# EAGLE board Leak+Hunter+v2 (EAGLE 9.7.0)
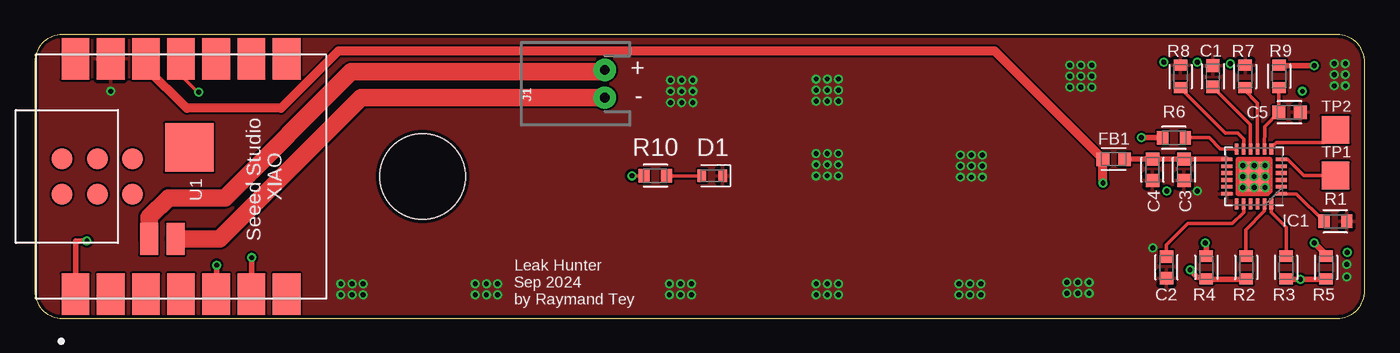
[diagram p0: board, top side]
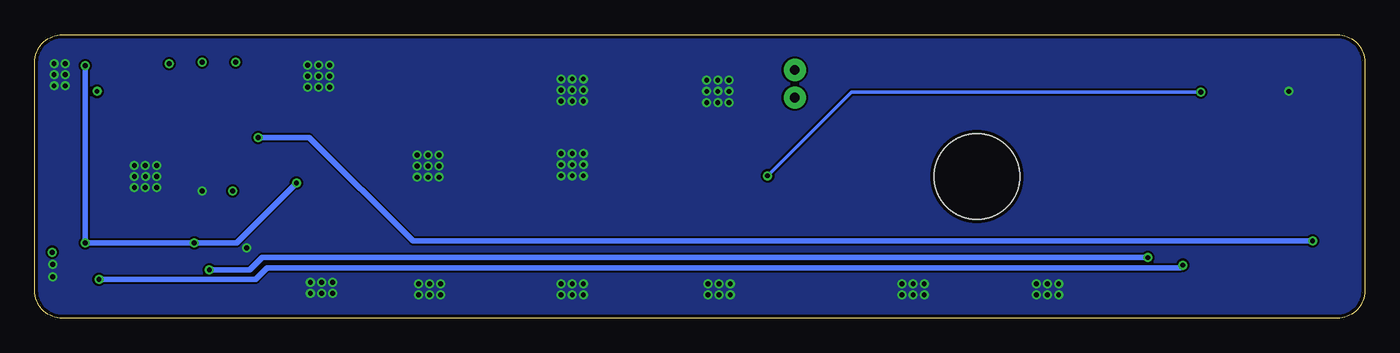
[diagram p1: board, bottom side, seen from below]

Size 96 x 20.5 mm. Coordinates in mm from the lower left corner, seen from the top.
Outline: 0,18.5 0,2 arc90 2,0 94,0 arc90 96,2 96,18.5 arc90 94,20.5 2,20.5 arc90 0,18.5
Copper layers (1*16): Top 0.035mm / dielectric 1.5mm / Bottom 0.035mm
Design rules "Fusion Electronics Design Rules": minimum track width 6mil, minimum drill 0.2mm, track to track 0.15mm, track to pad 0.15mm, pad to pad 0.15mm, via to via 0.15mm, smd to smd 0.15mm, copper to edge 0.25mm, drill to drill 0.2mm, minimum pad ring 0.15mm, minimum via ring 0.15mm, stop-mask expansion 4mil, vias tented up to drill 0mil, thermal gap 10mil
Net classes: 0 default: width 0.254 mm
Holes 6.2 mm at 28,10.25

## Footprints (pad centres in the part's own frame; a part is rotated, then mirrored left to right if it is on the bottom)
CAPC1608X85 = smd 0.921 x 0.97: 1 -0.775,0; 2 0.775,0
LEDC1608X80N_FLAT-R = smd 0.612 x 0.912: A 0.75,0; C -0.75,0
BEADC1608X95N = smd 0.9 x 0.97: 1 -0.785,0 | smd 0.933 x 0.97: 2 0.769,0
QFN50P400X400X95-25T265X275N = smd 0.26 x 0.79: 1 -1.25,-1.97; 2 -0.75,-1.97; 3 -0.25,-1.97; 4 0.25,-1.97; 5 0.75,-1.97; 6 1.25,-1.97; 13 1.25,1.97; 14 0.75,1.97; 15 0.25,1.97; 16 -0.25,1.97; 17 -0.75,1.97; 18 -1.25,1.97 | smd 0.79 x 0.26: 7 1.97,-1.25; 8 1.97,-0.75; 9 1.97,-0.25; 10 1.97,0.25; 11 1.97,0.75; 12 1.97,1.25; 19 -1.97,1.25; 20 -1.97,0.75; 21 -1.97,0.25; 22 -1.97,-0.25; 23 -1.97,-0.75; 24 -1.97,-1.25 | smd 2.15 x 2.05: 25 0,0
JST-2-PTH-NS = drill 0.7 pad 1.6: 1 -1,0; 2 1,0
RESC1608X60 = smd 0.799 x 0.974: 1 -0.815,0; 2 0.815,0
TP20SQ = smd 2 x 2: TP 0,0
XIAO-ESP32C3-MODULE14P-2.54-21X17.8MM = smd 3 x 2: 1 -8.5,7.62; 2 -8.5,5.08; 3 -8.5,2.54; 4 -8.5,0; 5 -8.5,-2.54; 6 -8.5,-5.08; 7 -8.5,-7.62; 8 8.5,-7.62; 9 8.5,-5.08; 10 8.5,-2.54; 11 8.5,0; 12 8.5,2.54; 13 8.5,5.08; 14 8.5,7.62 | smd 1.5 x 1.5: 15 -1.27,8.58; 16 1.27,8.58; 17 -1.27,6.04; 18 1.27,6.04; 19 -1.27,3.5; 20 1.27,3.5 | smd 2.3 x 1.3: 21 -4.5,2.3; 22 -4.5,0.4 | smd 3.5 x 3.5: 23 2.1,-0.6

## Placement (x,y rotation side)
C1  100n  [CAPC1608X85]  85.03,17.49 90 top
C2  2.2n  [CAPC1608X85]  81.68,3.68 270 top
C3  100n  [CAPC1608X85]  82.95,10.74 270 top
C4  10µ  [CAPC1608X85]  80.67,10.74 270 top
C5  10n  [CAPC1608X85]  90.57,14.89 0 top
D1  LED_RED  [LEDC1608X80N_FLAT-R]  48.9,10.3 180 top
FB1  FERRITE_BEAD  [BEADC1608X95N]  77.87,11.5 180 top
IC1  MPU6050  [QFN50P400X400X95-25T265X275N]  88,10.25 90 top
J1  [JST-2-PTH-NS]  41.14,16.95 90 top
R1  0  [RESC1608X60]  93.87,7 0 top
R2  0  [RESC1608X60]  87.44,3.68 90 top
R3  0  [RESC1608X60]  90.31,3.68 90 top
R4  4.7k  [RESC1608X60]  84.56,3.68 90 top
R5  4.7k  [RESC1608X60]  93.19,3.68 90 top
R6  0  [RESC1608X60]  82.22,13.05 0 top
R7  4.7k  [RESC1608X60]  87.36,17.47 90 top
R8  0  [RESC1608X60]  82.7,17.47 90 top
R9  0  [RESC1608X60]  89.81,17.49 90 top
R10  150  [RESC1608X60]  44.8,10.3 0 top
TP1  TPTP20SQ  [TP20SQ]  93.88,10.31 0 top
TP2  TPTP20SQ  [TP20SQ]  93.88,13.61 0 top
U1  XIAO-ESP32C3  [XIAO-ESP32C3-MODULE14P-2.54-21X17.8MM]  10.57,10.25 90 top

## Library data of the parts
C1-C5 = Capacitor; CATEGORY: Capacitor
D1 = LED; CATEGORY: LED; COLOR: RED; DESCRIPTION: CHIP LED FLAT; SUB-CATEGORY: CHIP; TYPE: FLAT_TOP
FB1 = Filter; CATEGORY: Filter; SUB-CATEGORY: Ferrite bead
IC1 = invensense
J1 = SparkFun-Connectors
R1-R10 = Resistor; CATEGORY: Resistor; SUB-CATEGORY: Fixed
TP1 TP2 = testpad
U1 = Seeed Studio XIAO Series

## Nets
+3.3V: FB1.2 R4.2 R5.2 R9.2 U1.12
+3.3V_MEMS: C3.1 C4.1 FB1.1 IC1.13
+3.3V_MEMS_VLOGIC: C5.1 IC1.8 R9.1
GND: C1.2 C2.2 C3.2 C4.2 C5.2 D1.C IC1.18 IC1.25 R1.2 R7.2 R8.2 U1.13
N$1: IC1.7 TP2.TP
N$2: IC1.6 TP1.TP
N$3: IC1.1 R1.1
N$4: IC1.23 R2.2
N$5: R2.1 R4.1 U1.6
N$6: IC1.24 R3.2
N$7: R3.1 R5.1 U1.5
N$8: IC1.9 R7.1
N$9: IC1.12 R6.2
N$10: R6.1 U1.1
N$11: IC1.11 R8.1
N$12: C1.1 IC1.10
N$13: C2.1 IC1.20
N$14: J1.1 U1.22
N$15: J1.2 U1.21
N$22: R10.1 U1.11
N$23: D1.A R10.2

## Tracks (layer width: path | path; a pad name or v marks a point on that pad's centre or on a via)
+3.3V  (via drill 0.35)
  Top 0.381: v84.47,5.46 84.56,5.38 R4.2 | v92.35,5.46 93.19,4.61 R5.2 | v92.35,18.25 89.86,18.25
  Top 0.635: v77.11,9.78 FB1.2 69.28,19.32 21.91,19.32 17.78,15.18 10.97,15.18 8.03,18.13 U1.12 | 89.86,18.25 R9.2
  Bottom 0.381: v77.11,9.78 81.43,5.46 v84.47,5.46 v92.35,5.46 v92.35,18.25
+3.3V_MEMS
  Top 0.381: FB1.1 78.67,11.51 C4.1 C3.1 86.02,11.51 IC1.13
+3.3V_MEMS_VLOGIC
  Top 0.254: IC1.8 88.78,13.87 C5.1 89.8,16.66 R9.1
GND  (via drill 0.35)
  other vias: 88,10.25 88.8,10.25 88.8,11.05 88.03,11.05 87.2,11.05 87.2,10.25 87.2,9.45 88.03,9.45 5.5,16.4 80.7,5.1 83.9,9.2 76.3,17.5 58,11.1 47.5,16.4 58,16.5 94.6,17.6 68.4,11 76.1,1.8 68.3,1.7 58,1.7 47.4,1.7 33.4,1.7 23.7,1.7 76.3,18.3 58,11.9 47.5,17.2 58,17.3 94.6,18.4 68.4,11.8 76.1,2.6 68.3,2.5 58,2.5 47.4,2.5 33.4,2.5 23.7,2.5 74.7,18.3 56.4,11.9 45.9,17.2 56.4,17.3 66.8,11.8 74.5,2.6 66.7,2.5 56.4,2.5 45.8,2.5 31.8,2.5 22.1,2.5 75.5,18.3 57.2,11.9 46.7,17.2 57.2,17.3 93.8,18.4 67.6,11.8 75.3,2.6 67.5,2.5 57.2,2.5 46.6,2.5 32.6,2.5 22.9,2.5 74.7,16.7 56.4,10.3 45.9,15.6 56.4,15.7 66.8,10.2 74.7,17.5 56.4,11.1 45.9,16.4 56.4,16.5 66.8,11 74.5,1.8 66.7,1.7 56.4,1.7 45.8,1.7 31.8,1.7 22.1,1.7 75.5,16.7 57.2,10.3 46.7,15.6 57.2,15.7 93.8,16.8 67.6,10.2 76.3,16.7 58,10.3 47.5,15.6 58,15.7 94.6,16.8 68.4,10.2 75.5,17.5 57.2,11.1 46.7,16.4 57.2,16.5 93.8,17.6 67.6,11 75.3,1.8 67.5,1.7 57.2,1.7 46.6,1.7 32.6,1.7 22.9,1.7 94.7,3.9 94.7,3 88.8,9.45
  pour Top: 2.01,0.13 93.99,0.13 94.29,0.15 94.58,0.22 94.85,0.33 95.1,0.49 95.32,0.68 95.51,0.9 95.67,1.15 95.78,1.42 95.85,1.71 95.87,2.01 95.87,18.49 95.85,18.79 95.78,19.08 95.67,19.35 95.51,19.6 95.32,19.82 95.1,20.01 94.85,20.17 94.58,20.28 94.29,20.35 93.99,20.37 2.01,20.37 1.71,20.35 1.42,20.28 1.15,20.17 0.9,20.01 0.68,19.82 0.49,19.6 0.33,19.35 0.22,19.08 0.15,18.79 0.13,18.49 0.13,2.01 0.15,1.71 0.22,1.42 0.33,1.15 0.49,0.9 0.68,0.68 0.9,0.49 1.15,0.33 1.42,0.22 1.71,0.15
  pour Bottom: 2.01,0.13 93.99,0.13 94.29,0.15 94.58,0.22 94.85,0.33 95.1,0.49 95.32,0.68 95.51,0.9 95.67,1.15 95.78,1.42 95.85,1.71 95.87,2.01 95.87,18.49 95.85,18.79 95.78,19.08 95.67,19.35 95.51,19.6 95.32,19.82 95.1,20.01 94.85,20.17 94.58,20.28 94.29,20.35 93.99,20.37 2.01,20.37 1.71,20.35 1.42,20.28 1.15,20.17 0.9,20.01 0.68,19.82 0.49,19.6 0.33,19.35 0.22,19.08 0.15,18.79 0.13,18.49 0.13,2.01 0.15,1.71 0.22,1.42 0.33,1.15 0.49,0.9 0.68,0.68 0.9,0.49 1.15,0.33 1.42,0.22 1.71,0.15
N$1
  Top 0.254: TP2.TP 93.86,13.5 93.06,12.71 89.61,12.71 89.25,12.35 IC1.7
N$2
  Top 0.254: TP1.TP 91.6,10.31 90.42,11.5 IC1.6
N$3
  Top 0.254: R1.1 91.06,9 IC1.1
N$4
  Top 0.254: IC1.23 88.75,7.75 87.4,6.4 87.4,4.53 R2.2
N$5  (via drill 0.35)
  Top 0.254: R2.1 87.41,2.89 87.38,2.83
  Top 0.381: 87.38,2.83 84.64,2.83 R4.1 84.46,2.96 83.92,2.96 v83.39,3.5 | v15.65,4.39 15.65,4.25 U1.6
  Bottom 0.381: v15.65,4.39 79.6,4.39 80.49,3.5 v83.39,3.5
N$6
  Top 0.254: R3.2 90.32,6.58 89.25,7.65 IC1.24
N$7  (via drill 0.35)
  Top 0.381: R3.1 90.35,2.83 v91.35,2.83 93.1,2.83 R5.1 | v13.14,3.84 13.14,1.79 U1.5
  Bottom 0.381: v91.35,2.83 80.06,2.83 79.23,3.66 13.33,3.66 v13.14,3.84
N$8
  Top 0.254: R7.1 87.27,16.61 87.27,16.55 88.25,15.56 IC1.9
N$9
  Top 0.254: R6.2 84.76,13.05 85.59,12.22 IC1.12
N$10  (via drill 0.35)
  Top 0.381: v79.87,13.07 81.37,13.07 R6.1 | v3.77,5.6 2.97,5.6 2.97,1.77 U1.1
  Bottom 0.381: v3.77,5.6 68.7,5.6 76.18,13.07 v79.87,13.07
N$11
  Top 0.254: R8.1 82.7,16.63 85.94,13.39 86.83,13.39 87.25,12.97 IC1.11
N$12
  Top 0.254: C1.1 87.75,13.99 IC1.10
N$13
  Top 0.254: C2.1 81.68,5.3 83.23,6.84 86.44,6.84 87.25,7.65 IC1.20
N$14
  Top 1.27: J1.1 23.57,15.95 13.37,5.75 U1.22
N$15
  Top 1.27: J1.2 41.01,17.82 22.85,17.82 13.74,8.71 9.67,8.71 8.27,7.31 U1.21
N$16  (via drill 0.35)
  other vias: 81.7,9.2
N$17  (via drill 0.35)
  other vias: 94.72,4.78
N$18  (via drill 0.35)
  other vias: 81.5,18.5
N$19  (via drill 0.35)
  other vias: 83.9,18.5
N$20  (via drill 0.35)
  other vias: 86.3,18.4
N$21  (via drill 0.35)
  other vias: 91.5,16.4
N$22  (via drill 0.35)
  Top 0.254: U1.11 10.57,17.53 11.8,16.3 v11.85,16.35 | v43.1,10.3 R10.1
  Bottom 0.254: v43.1,10.3 37.05,16.35 v11.85,16.35
N$23
  Top 0.254: R10.2 D1.A

## Text on the board
tNames: + | - | Leak Hunter / Sep 2024 / by Raymand Tey